# Altium PCB S67_01_3913.PcbDoc
Units mil, origin at the board's own origin, x right, y up, seen from the top; angles counter-clockwise.
Board outline 6000 x 4000 mil, 2 copper layers (Top Layer, Bottom Layer); 23 components, 15 nets, 71 pads, 0 vias.
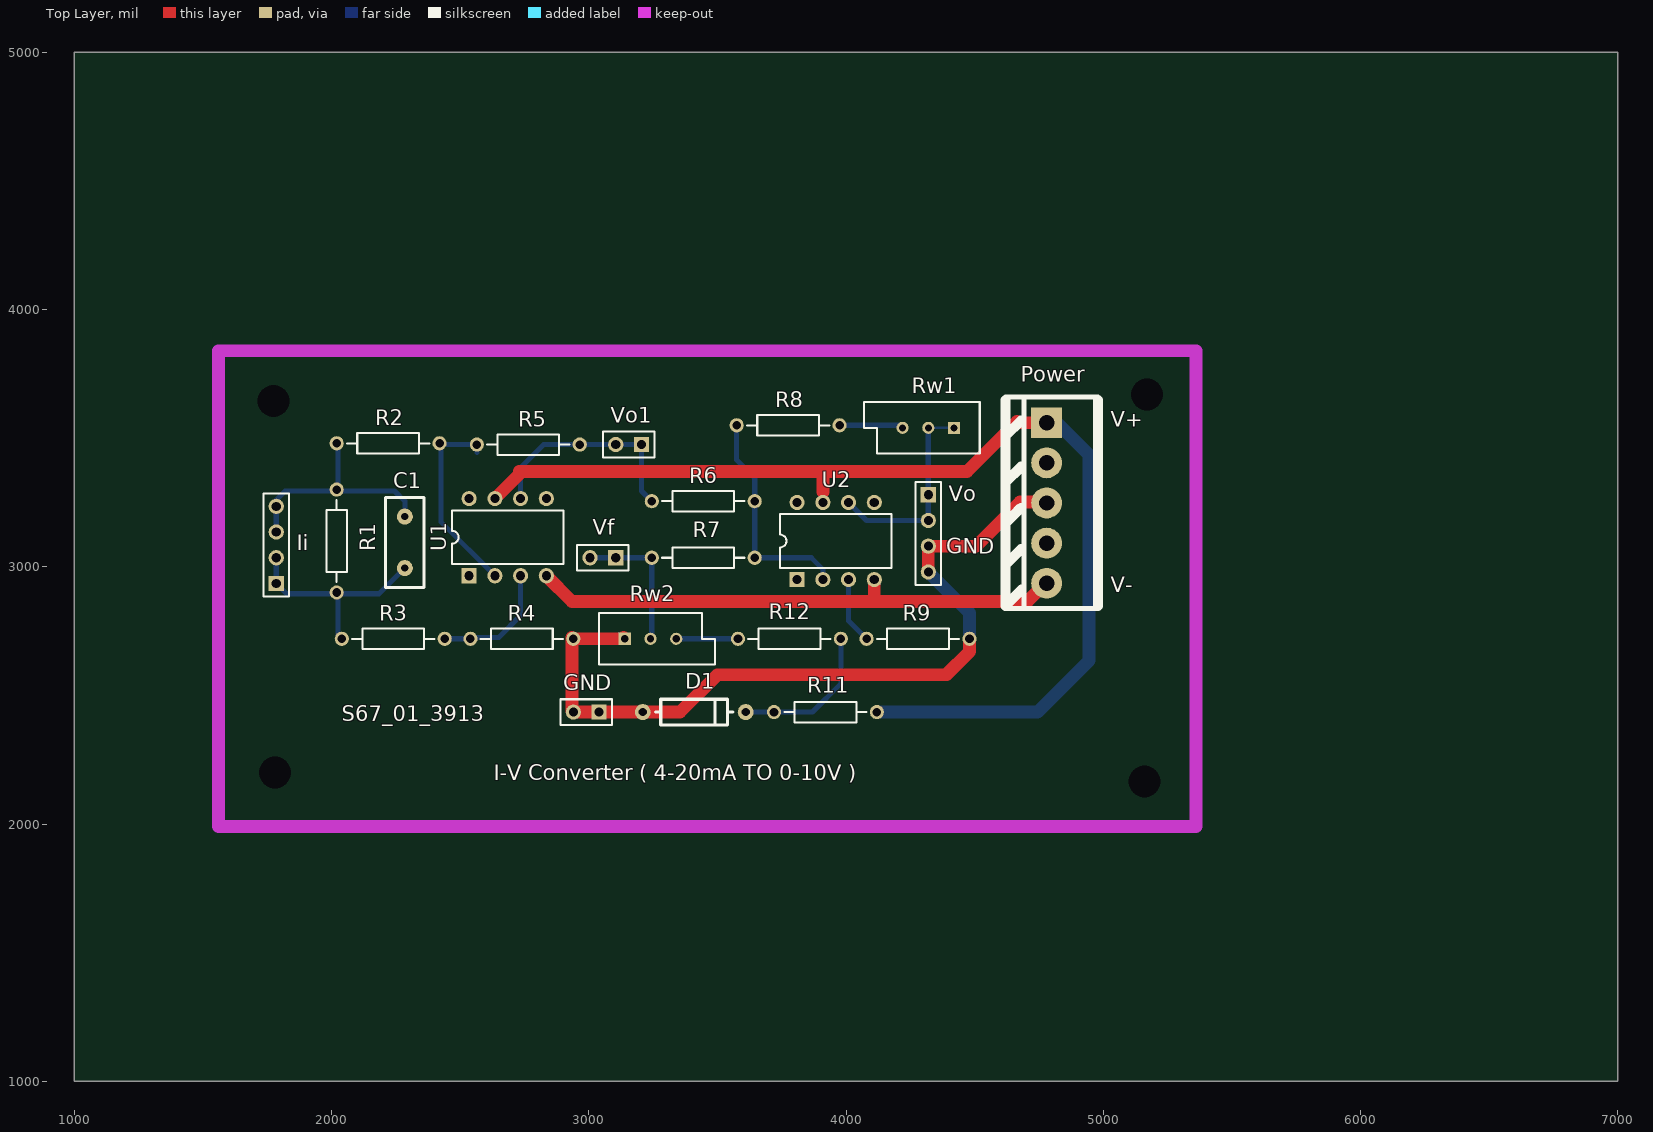
[diagram p0: Top Layer view]
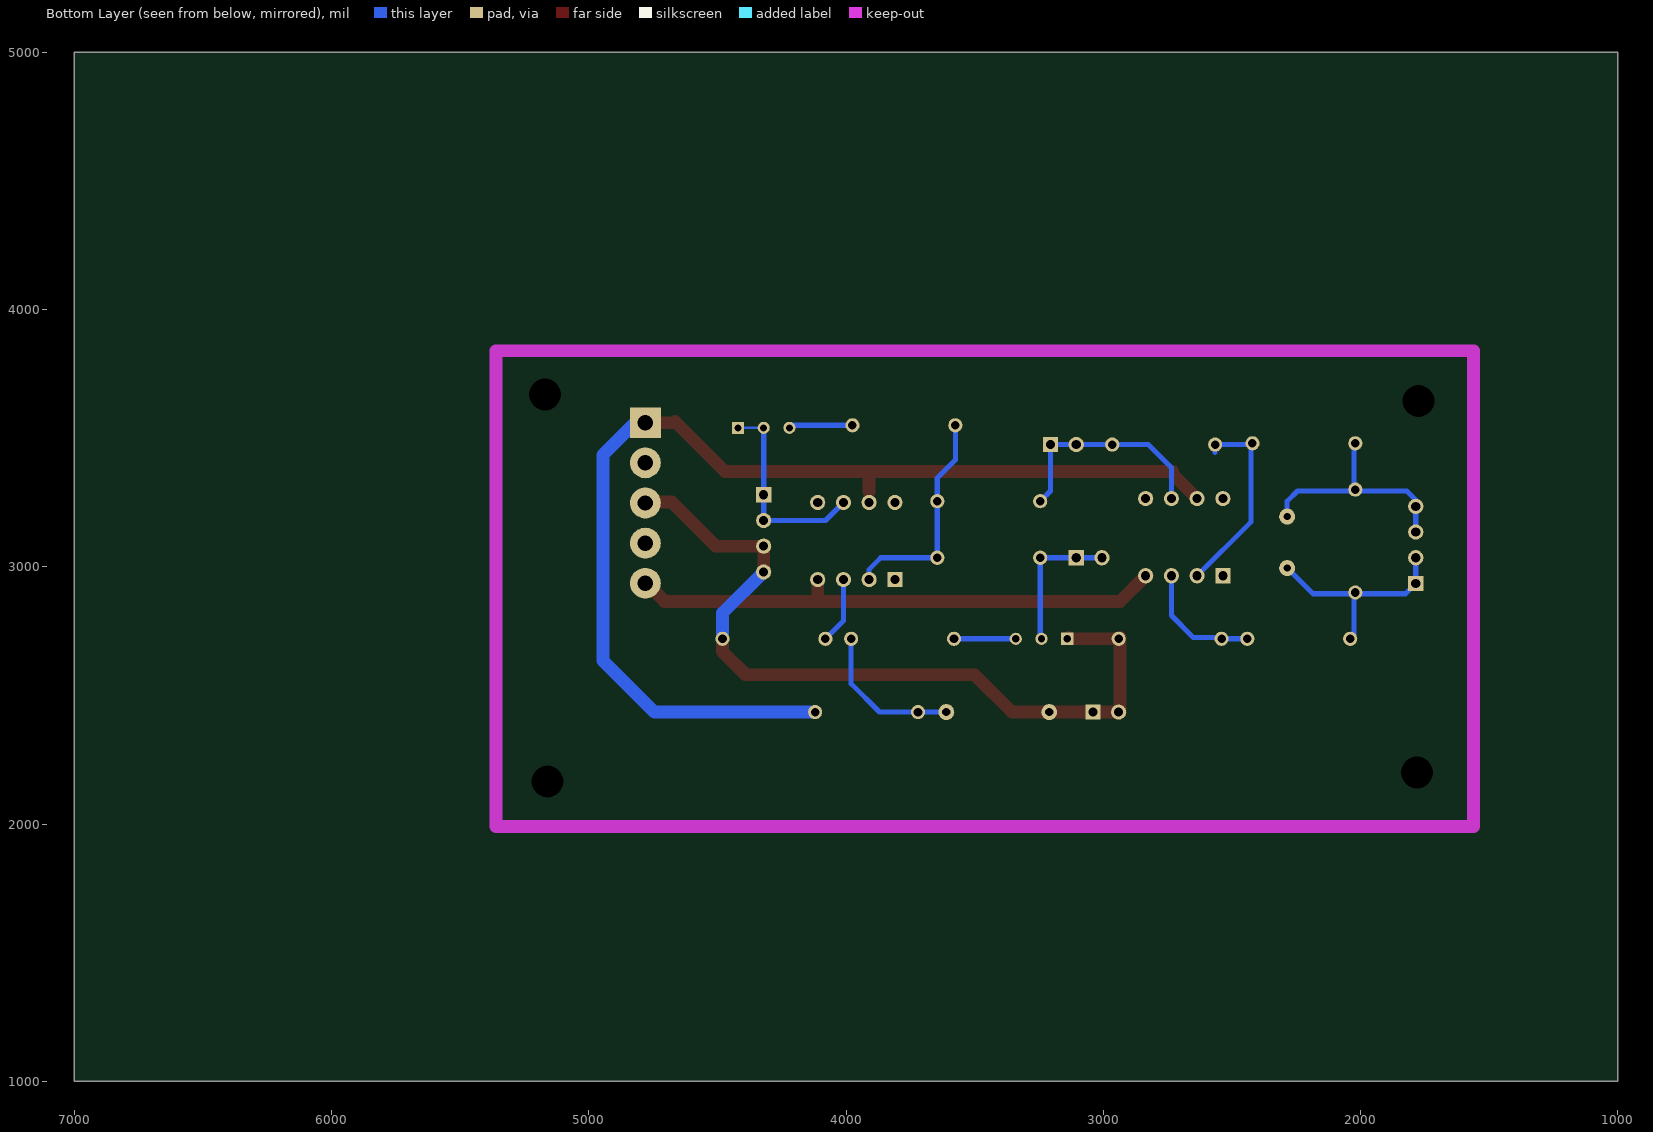
[diagram p1: Bottom Layer view, seen from below]

## Layer stack, top to bottom
Top Layer: signal copper 1.4
Dielectric: dielectric 12.6, FR-4, Dk 4.8
Bottom Layer: signal copper 1.4

## Board outline
1000,1000 7000,1000 7000,5000 1000,5000

## Design rules (kind name [scope] priority, off if disabled: settings)
Clearance [All] p1: gap=10
HoleSize [All] p1: absolutevalues=TRUE maxlimit=125 minlimit=1 maxpercent=80.000 minpercent=20.000
PolygonConnect [All] p1: connectstyle=Relief reliefconductorwidth=10 reliefentries=4 polygonreliefangle="90 Angle"
RoutingVias [All] p1: holewidth=28 width=50 viastyle="Through Hole" minholewidth=28 minwidth=50 maxholewidth=28 maxwidth=50
SilkscreenOverComponentPads [All] p1 off: minsilkscreentomaskgap=10
SolderMaskExpansion [All] p1: expansion=4
TestPointUsage [All] p1: valid=0 allowmultiple=FALSE
Testpoint [All] p1: side=15 testpointundercomponent=TRUE minsize=40 maxsize=100 preferedsize=60 minholesize=0 maxholesize=40 preferedholesize=32 testpointgrid=1 style=1023 order=0123456789
Width [All] p1: maxlimit=50 minlimit=10 preferedwidth=10 minimp=50.000000 maximp=50.000000 favimp=50.000000
22 further rules are at their usual default settings.

## Components (designator, comment, footprint, x,y, rotation, side; value= is the part's Value field where it differs from the comment)
C1 "Cap" RAD0.2 2285,2995 r90 top
D1 "D Zener" DIODE0.4 3210,2435 r0 top
GND "Header 2" HDR1X2 3040,2435 r180 top
Ii "Header 4" HDR1X4 1785,2935 r90 top
Power "Header 5" "POWER PLUG5" 4780,3560 r90 top
R1 "Res2" AXIAL-0.4 2020,3100 r90 top
R2 "Res2" AXIAL-0.4 2220,3480 r180 top
R3 "Res2" AXIAL-0.4 2240,2720 r180 top
R4 "Res2" AXIAL-0.4 2740,2720 r0 top
R5 "Res2" AXIAL-0.4 2765,3475 r0 top
R6 "Res2" AXIAL-0.4 3445,3255 r0 top
R7 "Res2" AXIAL-0.4 3445,3035 r0 top
R8 "Res2" AXIAL-0.4 3775,3550 r0 top
R9 "Res2" AXIAL-0.4 4280,2720 r180 top
R11 "Res2" AXIAL-0.4 3920,2435 r0 top
R12 "Res2" AXIAL-0.4 3780,2720 r0 top
Rw1 "RPot" VR5 4320,3540 r180 top
Rw2 "RPot" VR5 3240,2720 r0 top
U1 "OP07CN" DIP8 2685,3115 r0 top
U2 "OP07CN" DIP8 3960,3100 r0 top
Vf "Header 2" HDR1X2 3105,3035 r180 top
Vo "Header 4" HDR1X4 4320,3280 r270 top
Vo1 "Header 2" HDR1X2 3205,3475 r180 top

## Footprints (in the part's own frame and the unit in brackets; to place one, negate y for a bottom-side part, rotate by r counter-clockwise, add the part's x,y. Pads: shape width x height; smd on the part's side, far side on the other; paste and mask are expansions set on the pad)
AXIAL-0.4 [mm] "Resistor; 2 Leads"
  round 1.4 hole 0.85: 1(-5.08,0) 2(5.08,0)
  silkscreen extent -4.06,-1.02 4.06,1.02
DIODE0.4 [mil]
  round 62 hole 32: 1(0,0) 2(400,0)
  silkscreen extent 50,-50 350,50
DIP8 [mm] "DIP; 8 Leads; Row Spacing 7.62 mm; Pitch 2.54 mm"
  rect 1.5x1.5 hole 0.9: 1(-3.81,-3.81)
  round 1.5 hole 0.9: 2(-1.27,-3.81) 3(1.27,-3.81) 4(3.81,-3.81) 5(3.81,3.81) 6(1.27,3.81) 7(-1.27,3.81) 8(-3.81,3.81)
  silkscreen extent -5.5,-2.65 5.5,2.65
HDR1X2 [mm] "Connector; Header; 2 Position"
  rect 1.5x1.5 hole 0.9: 1(0,0)
  round 1.5 hole 0.9: 2(2.54,0)
  silkscreen extent -1.27,-1.27 3.81,1.27
HDR1X4 [mm] "Connector; Header; 4 Position"
  rect 1.5x1.5 hole 0.9: 1(0,0)
  round 1.5 hole 0.9: 2(2.54,0) 3(5.08,0) 4(7.62,0)
  silkscreen extent -1.27,-1.27 8.89,1.27
"POWER PLUG5" [mil] "双电源插座"
  rect 120x120 hole 60: 1(0,0)
  round 120 hole 60: 2(-156,0) 3(-312,0) 4(-468,0) 5(-624,0)
  silkscreen extent -722,-200 100,160
RAD0.2 [mil]
  round 62 hole 28: 1(0,0) 2(200,0)
  silkscreen extent -75,-75 275,75
VR5 [mm] "Potentiometer; 3 Leads"
  rect 1.2x1.2 hole 0.7: 1(-2.54,0)
  round 1.2 hole 0.7: 2(0,0) 3(2.54,0)
  silkscreen extent -5.08,-2.54 6.35,2.54

## Part data
C1: "Capacitor"
D1: "Zener Diode"
GND Vf Vo1: "Header, 2-Pin"
Ii Vo: "Header, 4-Pin"
Power: "Header, 5-Pin"
R1 R2 R3 R4 R5 R6 R7 R8 R9 R11 R12: "Resistor"
Rw1 Rw2: "Potentiometer"
U1 U2: "Very Low Offset Single Bipolar Operational Amplifier"

## Free pads (board coordinates)
  round 60 hole 125: 0(1775,3645) 0(1780,2200) 0(5160,2165) 0(5170,3670)

## Nets (pads, with @x,y where several pads share a name; then routed paths per layer and width w, separated by ;. In a path a pad name is that pad's centre, name@x,y a point inside that pad or via, vN(x,y) a via of type N, cw(c..) or ccw(c..) an arc to the next point about the centre after c; other vN are vias at no path point)
+12V: Power.1 R11.2 U1.7 U2.7 | length 4302.8
  Top Layer w50: U1.7 2735,3365 ; 2730,3370 4470,3370 4665,3565 ; 3910,3290 3910,3365 ; 4670,3560 Power.1
  Bottom Layer w20: Power.1 Power.1@4820,3560 ; Power.1@4780,3564 Power.1@4816,3564
  Bottom Layer w50: R11.2 4745,2435 4945,2635 4945,3435 Power.1@4820,3560
-12V: Power.5 U1.4 U2.4 | length 2104.6
  Top Layer w50: U1.4 2935,2865 4705,2865 Power.5@4780,2940 ; 4105,2865 4110,2870 U2.4
GND: D1.1 GND.1 GND.2 Power.3 R4.2 R9.1 Rw2.1 Vo.3 Vo.4 | length 3144
  Top Layer w50: R4.2@2935,2720 Rw2.1@3135,2720 ; R4.2@2935,2725 2935,2440 GND.2 D1.1 3355,2435 3500,2580 4390,2580 4480,2670 R9.1 ; Rw2.1@3135,2725 Rw2.1 ; Vo.4 Vo.3 4505,3080 4677,3252 Power.3@4780,3252
  Bottom Layer w50: Vo.4 4480,2820 R9.1
NetC1_1: C1.1 Ii.1 Ii.2 R1.1 R3.2 | length 839.2
  Bottom Layer w20: Ii.2 Ii.1 1825,2895 R1.1@2025,2895 ; R3.2 2025,2735 R1.1@2025,2895 ; C1.1 2185,2895 R1.1@2025,2895
NetC1_2: C1.2 Ii.3 Ii.4 R1.2 R2.2 | length 896.1
  Bottom Layer w20: Ii.3 Ii.4 1785,3260 1820,3295 R1.2@2025,3295 ; R2.2@2025,3475 R1.2@2025,3295 ; C1.2 2285,3255 2245,3295 R1.2@2025,3295
NetD1_2: D1.2 R11.1 R12.2 | length 590.6
  Bottom Layer w20: D1.2 R11.1 3870,2435 3980,2545 R12.2
NetR2_1: R2.1 R5.1 U1.2 | length 767
  Bottom Layer w20: 2565,3445 R5.1 2425,3475 2425,3175 U1.2
NetR3_1: R3.1 R4.1 U1.3 | length 487.3
  Bottom Layer w20: R3.1 2530,2720 2535,2725 2650,2725 2735,2810 U1.3
NetR5_2: R5.2 R6.1 U1.6 Vo1.1 Vo1.2 | length 863.8
  Bottom Layer w20: U1.6 2735,3385 2825,3475 R5.2 Vo1.1 3205,3295 R6.1
NetR6_2: R6.2 R7.2 R8.1 U2.2 | length 867.6
  Bottom Layer w20: R8.1 3575,3415 3645,3345 R7.2 3865,3035 3910,2990 U2.2
NetR7_1: R7.1 Rw2.2 Vf.1 Vf.2 | length 557.1
  Bottom Layer w20: Vf.2 R7.1 3245,2725 Rw2.2
NetR8_2: R8.2 Rw1.3 | length 249.1
  Bottom Layer w20: R8.2 4210,3550 Rw1.3
NetR9_2: R9.2 U2.3 | length 259
  Bottom Layer w20: U2.3 4010,2790 R9.2
NetR12_1: R12.1 Rw2.3 | length 240
  Bottom Layer w20: Rw2.3 R12.1
NetRw1_1: Rw1.1 Rw1.2 U2.6 Vo.1 Vo.2 | length 799
  Bottom Layer w10: Rw1.2 Rw1.1
  Bottom Layer w20: U2.6 4080,3180 Vo.2 Vo.1 Rw1.2
pads on no net: Power.2 Power.4 U1.1 U1.5 U1.8 U2.1 U2.5 U2.8

## Keep-outs
Keep-Out Layer:
  lines w50: 1560,1990 5360,1990 5360,3840 1560,3840 1560,1990

## Silkscreen, mask and mechanical layers (free items; w line width, h text height)
Top Overlay:
  text "V+" at 5030,3545 h60
  text "GND" at 4390,3050 h60
  text "V-" at 5030,2900 h60
  text "S67_01_3913" at 2040,2400 h60
  text "I-V Converter ( 4-20mA TO 0-10V )" at 2630,2170 h60